# Altium PCB HPM5151-EVK-Lite.PcbDoc
Units mil, origin at the board's own origin, x right, y up, seen from the top; angles counter-clockwise.
Board outline 2559.1 x 1181.16 mil, 2 copper layers (Top Layer 1, Bottom Layer), stack 67.792 mil thick; 80 components, 79 nets, 357 pads, 167 vias.
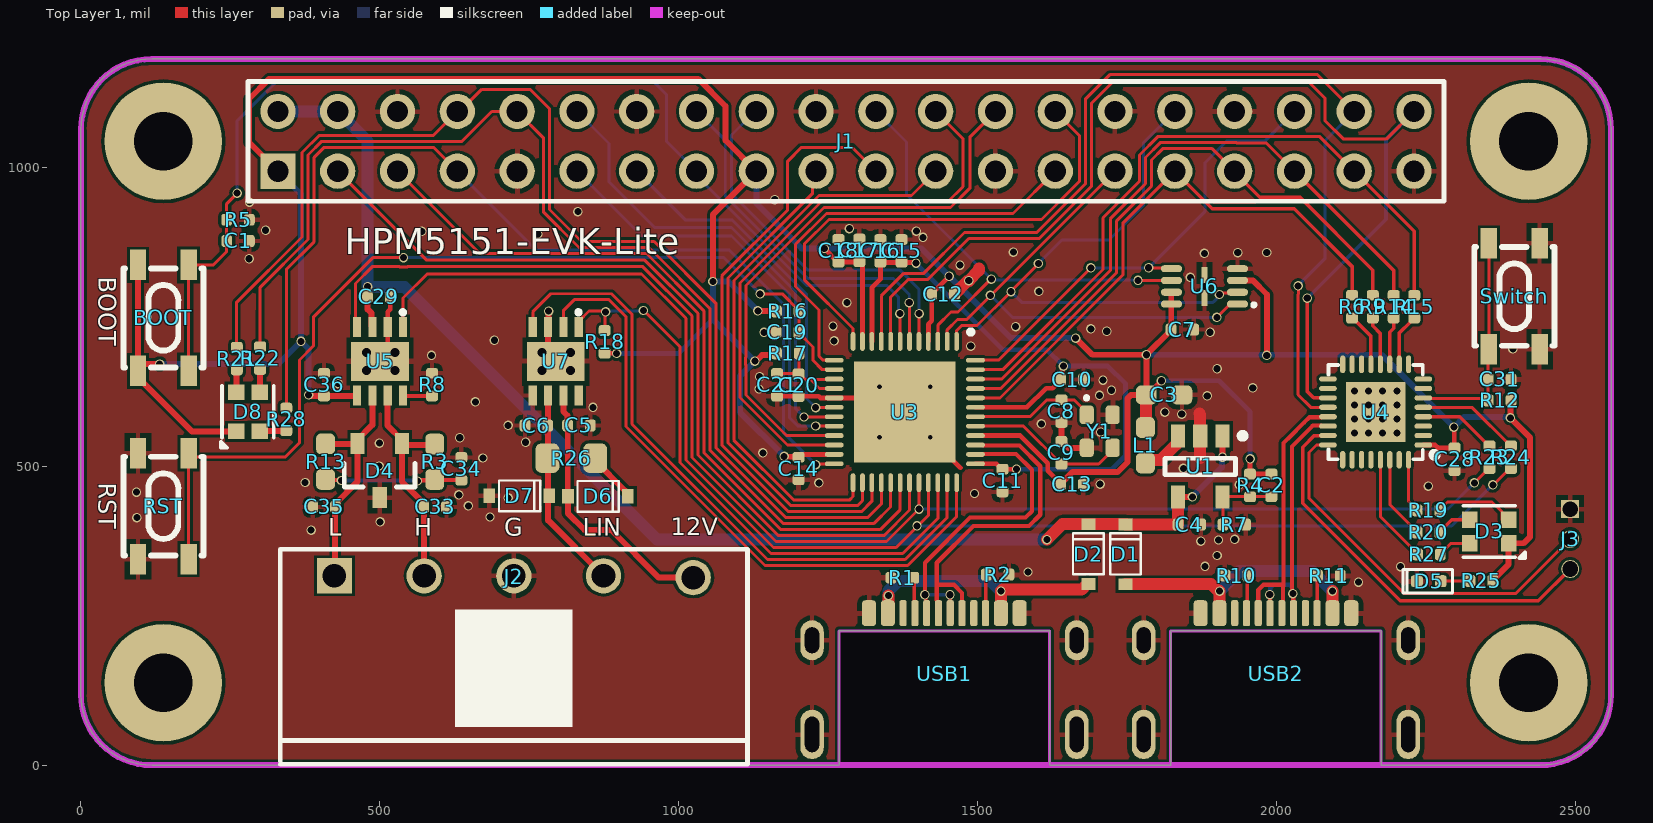
[diagram p0: Top Layer 1 view]
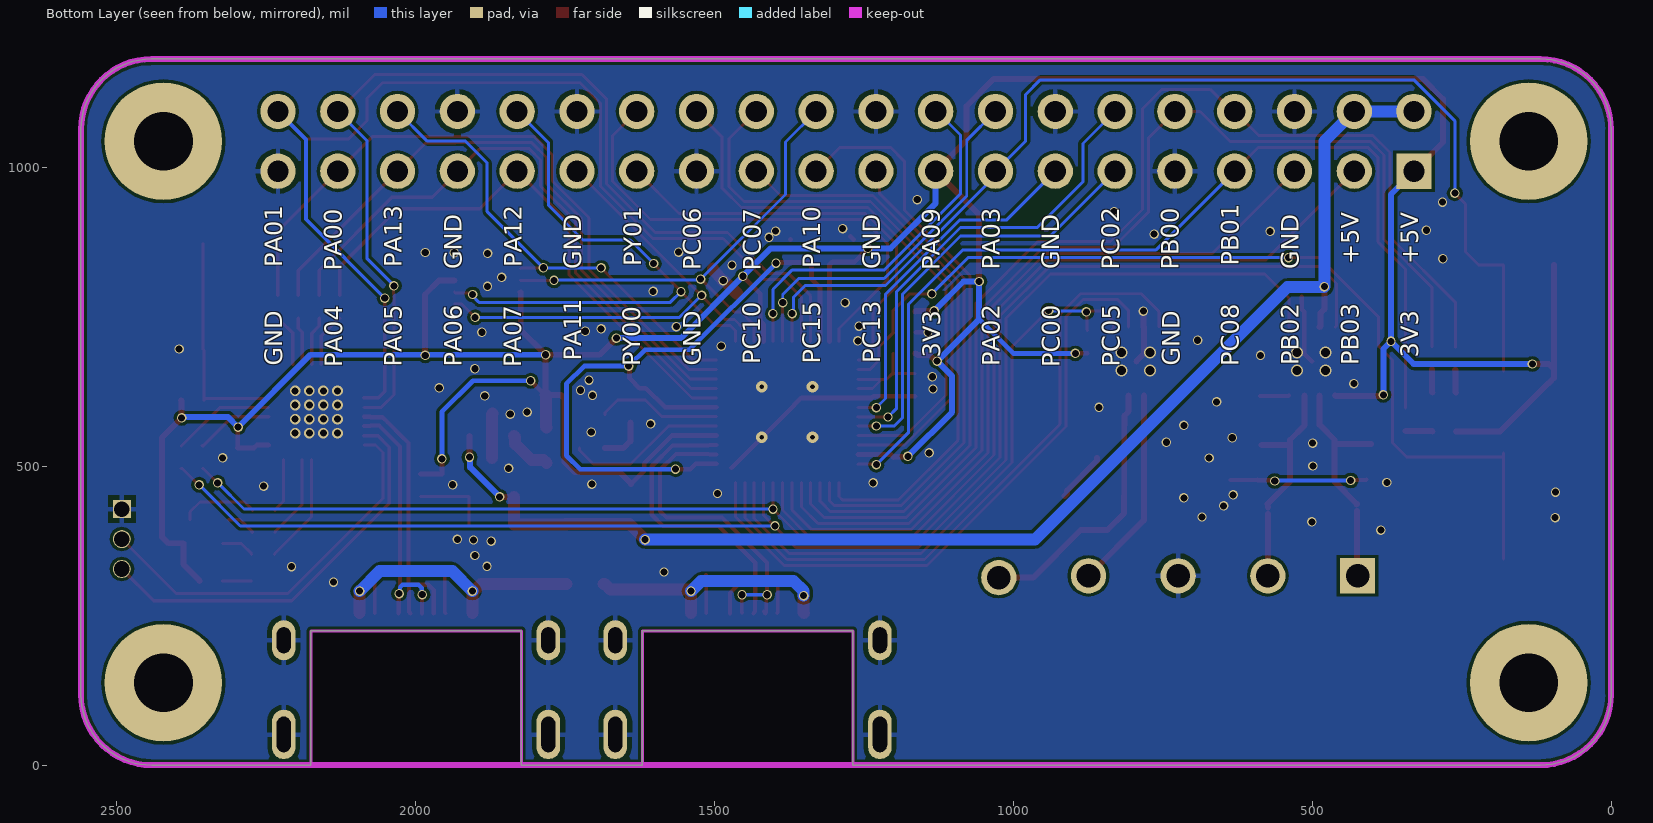
[diagram p1: Bottom Layer view, seen from below]

## Layer stack, top to bottom
Top Solder: solder mask 0.4, Solder Resist, Dk 3.5
Top Layer 1: signal copper 1.378
Dielectric 3: prepreg 2.8, PP-006, Dk 4.1
Dielectric1: dielectric 59.436, FR-4, Dk 4.8
Dielectric 4: prepreg 2.8, PP-006, Dk 4.1
Bottom Layer: signal copper 1.378
Bottom Solder: solder mask 0.4, Solder Resist, Dk 3.5

## Board outline
118.11,0.02 1268.06,0.02 1268.06,224.58 1620.03,224.58 1620.03,0.02 1822.59,0.02 1822.59,224.58 2174.55,224.58 2174.55,0.46 2175.05,-0.04 2440.91,-0.04 ccw(c2440.96,118.11) 2559.11,118.06 2559.06,118.12 2559.06,1063.02 2559.05,1063.55 ccw(c2440.94,1062.99) 2441.4,1181.1 2440.91,1181.12 118.11,1181.12 118.11,1181.09 ccw(c118.11,1062.99) 0.01,1062.99 0.01,118.12 ccw(c118.11,118.12)

## Design rules (kind name [scope] priority, off if disabled: settings)
Clearance [All] p1: gap=5 ignorepadtopadclearanceinfootprint=FALSE except(0: Arc-Hole Track-Hole SMDPad-Hole THPad-Hole Via-Hole Text-Hole)
DiffPairsRouting [All] p1: maxlimit=10 minlimit=1 mostfreqgap=7 toplayer_minwidth=1 toplayer_maxwidth=15 toplayer_prefwidth=7 bottomlayer_minwidth=1 bottomlayer_maxwidth=15 bottomlayer_prefwidth=7 maxuncoupledlength=500
FabricationTestPointUsage TestPointUsage [All] p1: valid=0 allowmultiple=FALSE
FabricationTestpoint Testpoint [All] p1: side=3 testpointundercomponent=TRUE minsize=40 maxsize=100 preferedsize=60 minholesize=0 maxholesize=40 preferedholesize=32 testpointgrid=1 allowsidetop=TRUE allowsidebottom=TRUE usegrid=TRUE gridtolerance=0.01
HoleSize [All] p1: absolutevalues=TRUE maxlimit=157.48 minlimit=1 maxpercent=80.000 minpercent=20.000
PlaneConnect [All] p1: planeconnectstyle=Direct reliefexpansion=20 reliefentries=4 reliefconductorwidth=10 reliefairgap=10
PolygonConnect [All] p1: thpad.connectstyle=Relief thpad.reliefconductorwidth=8 thpad.reliefentries=4 thpad.polygonreliefangle="90 Angle" thpad.airgapwidth=8 smdpad.connectstyle=Relief smdpad.reliefconductorwidth=8 smdpad.reliefentries=4 smdpad.polygonreliefangle="90 Angle" smdpad.airgapwidth=8 via.connectstyle=Direct via.reliefconductorwidth=10 via.reliefentries=4 via.polygonreliefangle="90 Angle" via.airgapwidth=10
RoutingVias [All] p1: holewidth=11.81 width=15.75 viastyle="Through Hole" minholewidth=7 minwidth=15.75 maxholewidth=157.48 maxwidth=236.22
SolderMaskExpansion [All] p1: expansion=4 istentingtop=FALSE
SupplyNets "Schematic Supply Nets_5" [InNet('VDD_12V')] p1: voltage=0.000
SupplyNets "Schematic Supply Nets_12" [InNet('VANA')] p2: voltage=0.000
SupplyNets "Schematic Supply Nets_6" [InNet('VDD_SOC')] p3: voltage=0.000
SupplyNets "Schematic Supply Nets_4" [InNet('VDD_3V3')] p4: voltage=0.000
SupplyNets "Schematic Supply Nets_3" [InNet('VDD_5V')] p5: voltage=0.000
SupplyNets "Schematic Supply Nets_2" [InNet('VUSB2')] p6: voltage=0.000
SupplyNets "Schematic Supply Nets_1" [InNet('VUSB1')] p7: voltage=0.000
SupplyNets "Schematic Supply Nets" [InNet('GND')] p8: voltage=0.000
Width [All] p1: maxlimit=30 minlimit=5 preferedwidth=10
25 further rules are at their usual default settings.

## Classes and differential pairs
component class CAN_LIN: C5 C6 C29 C33 C34 C35 C36 D4 D6 D7 J2 R3 R8 R13 R18 R26 U5 U7
component class DEBUG: C2 C3 C4 C28 C31 D1 D3 D5 J3 L1 R4 R6 R7 R9 R10 R11 R12 R14 R15 R19 R20 R23 R24 R25 R27 Switch U1 U4 USB2
component class MCU: BOOT C1 C7 C8 C9 C10 C11 C12 C13 C14 C15 C16 C17 C18 C19 C20 C21 D2 D8 J1 R1 R2 R5 R16 R17 R21 R22 R28 RST U3 U6 USB1 Y1
differential pair USBD: +USBD_P -USBD_N
differential pair DUSB: +DUSB_P -DUSB_N
differential pair CAN: +CAN_P -CAN_N

## Components (designator, comment, footprint, x,y, rotation, side; value= is the part's Value field where it differs from the comment)
BOOT "SW-PB4P" SW-PB4P 137.8,748.03 r270 top
C1 "100nF/50V" C0402 262.75,876.61 r0 top
C2 "22pF/50V" C0402 1990.97,467.97 r270 top
C3 "22uF/6.3V" C0603 1811.64,619.22 r0 top
C4 "4.7uF/10V" C0402 1853.91,402.44 r0 top
C5 "100nF/50V" C0402 832.97,568.15 r0 top
C6 "220pF/50V" C0402 761.69,567.92 r0 top
C7 "100nF/50V" C0402 1842.04,728.45 r0 top
C8 "10pF/50V" C0402 1639.95,592.06 r270 top
C9 "10pF/50V" C0402 1639.83,522.45 r90 top
C10 "100nF/50V" C0402 1657.76,644.91 r180 top
C11 "100nF/50V" C0402 1541.39,475.92 r270 top
C12 "100nF/50V" C0402 1442.08,787.88 r0 top
C13 "100nF/50V" C0402 1657.75,469.77 r0 top
C14 "100nF/50V" C0402 1200.3,496.11 r270 top
C15 "10uF/6.3V" C0402 1372.49,860.14 r90 top
C16 "100nF/50V" C0402 1337.16,860.14 r90 top
C17 "100nF/50V" C0402 1302.01,861.02 r90 top
C18 "10uF/6.3V" C0402 1267.03,860.31 r90 top
C19 "100nF/50V" C0402 1181.51,723.94 r180 top
C20 "100nF/50V" C0402 1200.3,635.42 r270 top
C21 "4.7uF/10V" C0402 1164.26,635.93 r270 top
C28 "100nF/50V" C0402 2297.24,511.58 r270 top
C29 "100nF/50V" C0402 498.18,782.93 r0 top
C31 "100nF/50V" C0402 2372.65,645.14 r180 top
C33 "47pF/50V" C0402 592.45,431.79 r180 top
C34 "10nF/50V" C0402 636.23,495.63 r270 top
C35 "47pF/50V" C0402 406.85,431.79 r180 top
C36 "100nF/50V" C0402 406.56,636.28 r90 top
D1 "B5817WS" SOD-323 1746.95,352.66 r90 top
D2 "B5817WS" SOD-323 1684.85,353.06 r90 top
D3 "LED" SMD_4P-L2.2-W2.1-BR 2355.18,390.79 r0 top
D4 "NUP2105L" SOT-23 499.7,492.63 r180 top
D5 "LED" "LED0402 GREEN" 2254.2,307.68 r0 top
D6 "PMEG4010BEA,115" SOD-323 864.45,449.69 r0 top
D7 "TVS" "SOD-323 TVS" 733.1,450.52 r0 top
D8 "LED" SMD_4P-L2.2-W2.1-BR 279.32,590.83 r270 top
J1 "Pin HDR2X20" "Pin HDR2X20/2.54mm-S" 1279.53,1043.31 r0 top locked
J2 "KF2EDGR-3.81-3P" KF2EDGR-3.81-5P 724.01,316.59 r0 top
J3 "HDR1X3" 1.27-3PIN 2490.69,378.07 r270 top
L1 "2.2uH" L0603 1780.34,534.98 r90 top
R1 "5.1K" R0402 1373.85,313.39 r0 top
R2 "5.1K" R0402 1533.26,318.62 r180 top
R3 "60.4R" R0603 591.69,507.36 r270 top
R4 "100K" R0402 1955.35,467.79 r270 top
R5 "10K" R0402 262.75,912.13 r180 top
R6 "22R" R0402 2125.93,766.7 r270 top
R7 "22.1K" R0402 1928.97,402.14 r0 top
R8 "10K" R0402 587.31,636.28 r270 top
R9 "22R" R0402 2160.55,766.7 r270 top
R10 "5.1K" R0402 1932.54,316.95 r0 top
R11 "5.1K" R0402 2087.06,316.95 r180 top
R12 "10K" R0402 2372.65,609.99 r180 top
R13 "60.4R" R0603 409.09,507.58 r90 top
R14 "22R" R0402 2195.58,766.7 r270 top
R15 "22R" R0402 2229.98,766.7 r270 top
R16 "10K" R0402 1182.15,758.99 r180 top
R17 "0R" R0402 1182.19,688.75 r180 top
R18 "10K" R0402 875.97,707.84 r90 top
R19 "2K" R0402 2253.51,426.22 r0 top
R20 "2K" R0402 2253.65,389.23 r0 top
R21 "2K" R0402 260.67,679.98 r270 top
R22 "2K" R0402 299.71,680.82 r270 top
R23 "22R" R0402 2355.74,514.95 r270 top
R24 "22R" R0402 2391.7,514.95 r270 top
R25 "2K" R0402 2342.16,308.09 r0 top
R26 "1K" R0805 820.17,513.39 r180 top
R27 "2K" R0402 2254.51,352.52 r0 top
R28 "2K" R0402 343.49,578.15 r270 top
RST "SW-PB4P" SW-PB4P 137.8,433.07 r270 top
Switch "SW-PB4P" SW-PB4P 2397.19,784.07 r270 top
U1 "TMI3408" SOT-23-5 1871.98,499.53 r270 top
U3 "HPM5151IN6" "QFN48 6*6" 1377.95,590.55 r270 top
U4 "CH32L103K8U6" QFN32_4*4 2165.35,590.55 r90 top
U5 "SIT1042TK/3" HVSON-8-EP(3X3) 500.31,675.32 r0 top
U6 "W25Q16JVUXIQ" USON-8-EP(2x3) 1879.11,800.73 r180 top
U7 "SIT1021QTK/1" HVSON-8-EP(3X3) 794.09,675.32 r0 top
USB1 "Type C" TYPE-C-16PIN-CB1.6 1444.04,152.77 r0 top
USB2 "Type C" TYPE-C-16PIN-CB1.6 1998.57,152.77 r0 top
Y1 "24MHz ±18ppm 20pF" "OSC 2016-4P" 1703.86,558.36 r270 top

## Footprints (in the part's own frame and the unit in brackets; to place one, negate y for a bottom-side part, rotate by r counter-clockwise, add the part's x,y. Pads: shape width x height; smd on the part's side, far side on the other; paste and mask are expansions set on the pad)
1.27-3PIN [mil]
  rect 30x30 hole 26: 1(-50,0)
  round 30 hole 26: 2(0,0) 3(50,0)
C0402 [mil]
  rrect50% 18x20 smd: 1(-19,0) 2(19,0)
  body extent -20,-10 20,10, height 22
C0603 [mm]
  rrect50% 0.88x0.8 smd: 1(-0.755,0) 2(0.755,0)
  body extent -0.8,-0.38 0.8,0.42, height 0.9
HVSON-8-EP(3X3) [mm]
  rect 0.35x0.85 smd: 1(0.975,1.45) 2(0.325,1.45) 3(-0.325,1.45) 4(-0.975,1.45) 5(-0.975,-1.45) 6(-0.325,-1.45) 7(0.325,-1.45) 8(0.975,-1.45)
  rect 2.45x1.65 smd: 9(0,0)
  silkscreen extent 0.92,2.03 1.02,2.13, body extent -1.5,-1.55 1.5,1.55, height 1
KF2EDGR-3.81-5P [mm]
  rect 1.5x1.5 hole 1: 1(-7.62,0)
  round 1.5 hole 1: 2(-3.81,0) 3(0,0) 4(3.81,0) 5(7.62,-0.076)
  silkscreen extent -9.92,-8 9.92,1.13, body extent -10.15,-17.07 10.29,1.33, height 7.88
L0603 [mm]
  rrect50% 0.88x0.8 smd: 1(-0.755,0) 2(0.755,0)
  body extent -0.8,-0.4 0.8,0.4, height 0.8
"LED0402 GREEN" [mil]
  rrect50% 20x20 smd: A(20,0) K(-20,0)
  silkscreen extent -43,-20 39,20, body extent -20,-10 20,9, height 18
"OSC 2016-4P" [mm] "Crystal, 4-Leads, Body 1.60x2.00mm, Pitch 1.40mm, IPC Medium Density"
  rrect50% 0.8x0.6 smd: 1(-0.7,-0.55) 2(0.7,-0.55) 3(0.7,0.55) 4(-0.7,0.55)
  silkscreen extent -1.45,-0.58 -1.4,-0.53, body extent -1.02,-0.82 1.03,0.83, height 0.4
"Pin HDR2X20/2.54mm-S" [mm] "Connector; Header; 20x2 Position"
  rect 1.5x1.5 hole 0.9: 1(-24.13,-1.27)
  round 1.5 hole 0.9: 2(-24.13,1.27) 3(-21.59,-1.27) 4(-21.59,1.27) 5(-19.05,-1.27) 6(-19.05,1.27) 7(-16.51,-1.27) 8(-16.51,1.27) 9(-13.97,-1.27) 10(-13.97,1.27) 11(-11.43,-1.27) 12(-11.43,1.27) 13(-8.89,-1.27) 14(-8.89,1.27) 15(-6.35,-1.27) 16(-6.35,1.27) 17(-3.81,-1.27) 18(-3.81,1.27) 19(-1.27,-1.27) 20(-1.27,1.27) 21(1.27,-1.27) 22(1.27,1.27) 23(3.81,-1.27) 24(3.81,1.27) 25(6.35,-1.27) 26(6.35,1.27) 27(8.89,-1.27) 28(8.89,1.27) 29(11.43,-1.27) 30(11.43,1.27) 31(13.97,-1.27) 32(13.97,1.27) 33(16.51,-1.27) 34(16.51,1.27) 35(19.05,-1.27) 36(19.05,1.27) 37(21.59,-1.27) 38(21.59,1.27) 39(24.13,-1.27) 40(24.13,1.27)
  silkscreen extent -25.4,-2.54 25.4,2.54, body extent -25.4,-2.54 25.4,2.54, height 7.58
QFN32_4*4 [mm]
  oval 0.22x0.75 smd mask+0.051: 1(-1.4,-2.025) 2(-1,-2.025) 3(-0.6,-2.025) 4(-0.2,-2.025) 5(0.2,-2.025) 6(0.6,-2.025) 7(1,-2.025) 8(1.4,-2.025) 17(1.4,2.025) 18(1,2.025) 19(0.6,2.025) 20(0.2,2.025) 21(-0.2,2.025) 22(-0.6,2.025) 23(-1,2.025) 24(-1.4,2.025)
  oval 0.75x0.22 smd mask+0.051: 9(2.025,-1.4) 10(2.025,-1) 11(2.025,-0.6) 12(2.025,-0.2) 13(2.025,0.2) 14(2.025,0.6) 15(2.025,1) 16(2.025,1.4) 25(-2.025,1.4) 26(-2.025,1) 27(-2.025,0.6) 28(-2.025,0.2) 29(-2.025,-0.2) 30(-2.025,-0.6) 31(-2.025,-1) 32(-2.025,-1.4)
  rect 2.54x2.54 smd mask+0.102: 33(0,0)
  silkscreen extent -2,-2.63 2,2, body extent -2,-2 2,2, height 0.73
"QFN48 6*6" [mm]
  oval 0.8x0.2 smd: 1(-3,2.2) 2(-3,1.8) 3(-3,1.4) 4(-3,1) 5(-3,0.6) 6(-3,0.2) 7(-3,-0.2) 8(-3,-0.6) 9(-3,-1) 10(-3,-1.4) 11(-3,-1.8) 12(-3,-2.2) 25(3,-2.2) 26(3,-1.8) 27(3,-1.4) 28(3,-1) 29(3,-0.6) 30(3,-0.2) 31(3,0.2) 32(3,0.6) 33(3,1) 34(3,1.4) 35(3,1.8) 36(3,2.2)
  oval 0.2x0.8 smd: 13(-2.2,-3) 14(-1.8,-3) 15(-1.4,-3) 16(-1,-3) 17(-0.6,-3) 18(-0.2,-3) 19(0.2,-3) 20(0.6,-3) 21(1,-3) 22(1.4,-3) 23(1.8,-3) 24(2.2,-3) 37(2.2,3) 38(1.8,3) 39(1.4,3) 40(1,3) 41(0.6,3) 42(0.2,3) 43(-0.2,3) 44(-0.6,3) 45(-1,3) 46(-1.4,3) 47(-1.8,3) 48(-2.2,3)
  rect 4.3x4.3 smd: 49(0,0)
  silkscreen extent -3.5,2.7 -3.3,2.9, body extent -3.05,-3.05 3.05,3.05, height 0.55
R0402 [mil]
  rrect50% 18x20 smd: 1(-19,0) 2(19,0)
  body extent -20,-10 20,10, height 16
R0603 [mm]
  rrect50% 0.88x0.8 smd: 1(-0.755,0) 2(0.755,0)
  body extent -0.8,-0.4 0.8,0.4, height 0.55
R0805 [mm]
  rrect50% 1.02x1.25 smd: 1(-1.015,0) 2(1.015,0)
  body extent -1,-0.63 1,0.63, height 0.6
SMD_4P-L2.2-W2.1-BR [mm]
  rect 0.66x0.7 smd paste+0 mask+0.05: 1(0.83,-0.5) 2(0.83,0.5) 3(-0.83,0.5) 4(-0.83,-0.5)
  silkscreen extent -1.1,-1.14 1.52,1.1, body extent -1.07,-1.03 1.07,1.02, height 1.92
SOD-323 [mm]
  rect 0.5x0.6 smd: A(-1.27,0) K(1.27,0)
  silkscreen extent -0.86,-0.65 0.89,0.65, body extent -1.36,-0.62 1.36,0.62, height 1.05
"SOD-323 TVS" [mm]
  rect 0.5x0.6 smd: 1(-1.27,0) 2(1.27,0)
  silkscreen extent -0.86,-0.65 0.89,0.65, body extent -1.36,-0.62 1.36,0.62, height 1.05
SOT-23 [mm]
  rect 0.6x0.9 smd: 1(-0.95,-1.15) 2(0.95,-1.15) 3(0,1.15)
  silkscreen extent -1.5,-0.3 1.5,0.7, body extent -1.47,-1.25 1.53,1.25, height 1.06
SOT-23-5 [mm]
  rect 0.99x0.6 smd: 1(-1.295,0.95) 2(-1.295,0) 3(-1.295,-0.95) 4(1.295,-0.95) 5(1.295,0.95)
  silkscreen extent -1.42,-1.5 0.35,1.93, body extent -1.4,-1.45 1.4,1.45, height 1.45
SW-PB4P [mm]
  rect 1.3x0.7 smd: 1(-2.25,1.075) 2(2.25,1.075) 3(2.25,-1.075) 4(-2.25,-1.075)
  silkscreen extent -2.1,-1.7 2.1,1.7, body extent -2.6,-1.63 2.6,1.63, height 2.5
TYPE-C-16PIN-CB1.6 [mm]
  oval 1x1.7 hole 0.6 slot 1.1 at 90 deg paste-2539.97 mask+0.05: 1(-5.62,1.425) 2(5.62,1.425)
  oval 1x2.1 hole 0.6 slot 1.5 at 90 deg copper offset 0,0 paste-2539.97 mask+0.05: 3(-5.62,-2.575) 4(5.62,-2.575)
  rrect50% 0.6x1.1 smd mask+0.05: A1(-3.2,2.575) A4(-2.4,2.575) A9(2.4,2.575) A12(3.2,2.575) B1(3.2,2.575) B4(2.4,2.575) B9(-2.4,2.575) B12(-3.2,2.575)
  rrect50% 0.3x1.1 smd mask+0.05: A5(-1.25,2.575) A6(-0.25,2.575) A7(0.25,2.575) A8(1.25,2.575) B5(1.75,2.575) B6(0.75,2.575) B7(-0.75,2.575) B8(-1.75,2.575)
  body extent -6.12,-5.02 6.12,1.73
USON-8-EP(2x3) [mm]
  oval 0.9x0.3 smd: 1(-1.4,0.75) 2(-1.4,0.25) 3(-1.4,-0.25) 4(-1.4,-0.75) 5(1.4,-0.75) 6(1.4,-0.25) 7(1.4,0.25) 8(1.4,0.75)
  rect 0.25x1.65 smd: 9(0,0)
  silkscreen extent -2.12,0.76 -2.07,0.81, body extent -1.55,-1 1.55,1, height 0.6

## Part data
BOOT: Manufacturer=DEALON(德艺隆), JCL-Code=C2905184, Name=Switch, PreferredModel=TD-1221SR-2.5H-250, WeldingType=SMD
C1 C5 C7 C10 C11 C12 C13 C14 C16 C17 C19 C20 C28 C29 C31: library part Cap, "Capacitor", JLC-Code=C307331, Manufacturer=SAMSUNG(三星), Name=Capacitance, PreferredModel=CL05B104KB54PNC, WeldingType=SMD
C2: library part Cap, "Capacitor", JLC-Code=C1555, Manufacturer=FH(风华), Name=Capacitance, PreferredModel=0402CG220J500NT, WeldingType=SMD
C3: library part Cap, "Capacitor", JLC-Code=C94018, Manufacturer=FH(风华), Name=Capacitance, PreferredModel=0603X226M6R3NT, WeldingType=SMD
C4: library part Cap, "Capacitor", JLC-Code=C368809, Manufacturer=SAMSUNG, Name=Capacitance, PreferredModel=CL05A475KP5NRNC, WeldingType=SMD
C6: library part Cap, "Capacitor", Manufacturer=Murata, InternalNumbering=GRD1205, JCL-Code=C388904, Name=Capacitance, PreferredModel=GCM155R71H221KA37D, WeldingType=SMD
C8 C9: library part Cap, "Capacitor", Manufacturer=muRata(村田), JCL-Code=C161520, Name=Capacitance, PreferredModel=GRM1555C1H100FA01D, WeldingType=SMD
C15 C18 C21: library part Cap, "Capacitor", Manufacturer=SAMSUNG, Name=Capacitance, WeldingType=SMD
  C15 C18: JCL-Code=C15525, PreferredModel=CL05A106MQ5NUNC
  C21: JCL-Code=C368809, PreferredModel=CL05A475KP5NRNC
C33 C35: library part Cap, "Capacitor", JLC-Code=C126511, Manufacturer=Murata, Name=Capacitance, PreferredModel=GCM1555C1H470JA16D, WeldingType=SMD
C34: library part Cap, "Capacitor", JLC-Code=C91601, Manufacturer=Murata, Name=Capacitance, PreferredModel=GCM155R71H103KA55D, WeldingType=SMD
C36: library part Cap, "Capacitor", JLC-Code=C85858, Manufacturer=Murata, InternalNumbering=GRD1123, Name=Capacitance, PreferredModel=GCM155R71H104KE02D, WeldingType=SMD
D1 D2: library part "Schottky Diode", "Schottky Diode", JLC-Code=C7420329, Manufacturer=R+O(宏嘉诚), Name="Schottky Diode", PreferredModel=B5817WS, WeldingType=SMD
D3 D8: library part LED_RGB, Name=LED, WeldingType=SMD
D4: "TVS", JLC-Code=C2890118, Manufacturer="TECH PUBLIC(台舟)", Name=TVS, PreferredModel=NUP2105LT1G, WeldingType=SMD
D6: library part "Schottky Diode", "Schottky Diode", JLC-Code=C36975, Manufacturer=Nexperia, Name="Schottky Diode", PreferredModel=PMEG4010BEA,115, WeldingType=SMD
J2: library part KF2EDGR-3.81-5P, Manufacturer=KEFA, Name=KF2EDGR-3.81-5P, PreferredModel=KF2EDGR-3.81-5P
L1: library part Inductors, "Inductors", JLC-Code=C48944989, Manufacturer=ZE(增益), Name=Inductors, PreferredModel=ZEMS160808-2R2M, WeldingType=SMD
R1 R2 R8 R10 R11 R12 R18 R19 R20 R21 R22 R25 R26 R27 R28: library part Res, "Resistance", Name=Resistance, WeldingType=SMD
R3 R13 R16: library part Res, "Resistance", JLC-Code=C144807, Manufacturer=YAGEO, Name=Resistance, WeldingType=SMD
  R3: InternalNumbering=GRD1496, PreferredModel=AC0603FR-0760R4L
  R13: PreferredModel=AC0603FR-0760R4L
  R16: PreferredModel=AC0402FR-0710KL
R4: library part Res, "Resistance", JLC-Code=C25741, Manufacturer=UNI-ROYAL(厚声), Name=Resistance, PreferredModel=0402WGF1003TCE, WeldingType=SMD
R5: library part Res, "Resistance", Manufacturer=YAGEO, InternalNumbering=GRD1049, JCL-Code=C144807, Name=Resistance, PreferredModel=AC0402FR-0710KL, WeldingType=SMD
R6 R9 R14 R15 R23 R24: library part Res, "Resistance", JLC-Code=C25092, Manufacturer=UNI-ROYAL(厚声), Name=Resistance, PreferredModel=0402WGF220JTCE, WeldingType=SMD
R7: library part Res, "Resistance", JLC-Code=C43473, Manufacturer=UNI-ROYAL(厚声), Name=Resistance, PreferredModel=0402WGF2212TCE, WeldingType=SMD
R17: library part Res, "Resistance", Manufacturer=UNI-ROYAL(厚声), Name=Resistance, PreferredModel=0402WGF0000TCE, WeldingType=SMD
RST Switch: JLC-Code=C2905184, Manufacturer=DEALON(德艺隆), Name=Switch, PreferredModel=TD-1221SR-2.5H-250, WeldingType=SMD
U1: library part SM8082AAAC, "Integrated Circuit", Manufacturer=silergy, Name=LDO, PreferredModel=SM8082AAAC, WeldingType=SMD
U3: library part HPM5151IN61_1, "32 bit RISC-V MCU", Manufacturer="HPMICRO Semiconductor", Name="32 bit RISC-V MCU", PreferredModel=HPM5151IN61, WeldingType=SMD
U4: "RISC-V MCU", Manufacturer=WCH, Name=MCU, PreferredModel=CH32L103K8U6, WeldingType=SMD
U5: "5M CAN FD/-40~125℃/AEC-Q100", JLC-Code=C38695, Manufacturer=SIT, Name="CAN Transceiver", PreferredModel=SIT1042TK/3, WeldingType=SMD
U6: "Serial flash memory with DUAL/QUAD SPI", Manufacturer=Winbond, Name="Serial flash memory", PreferredModel=W25Q16JVUXIQ, WeldingType=SMD
U7: "12V LIN/-40~150℃/AEC-Q100", Manufacturer=SIT(芯力特), Name="LIN Transceiver", PreferredModel=SIT1021QTK/1, WeldingType=SMD
USB1 USB2: "USB Type C", Name="USB Type C", WeldingType=SMD
Y1: library part XTAL_4P, Manufacturer=YXC(扬兴晶振), JCL-Code=C22434877, Name="Crystal oscillator", PreferredModel=XL7EL89COI-111YLC-24M, WeldingType=SMD
D5: Name=LED, WeldingType=SMD
D7: Name=TVS, WeldingType=SMD

## Free pads (board coordinates)
  round 196.85 hole 98.43: ""(137.81,137.8) ""(137.81,1043.32) ""(2421.27,137.8) ""(2421.27,1043.32)

## Via types
v1: diameter 15.75, hole 11.81, Top Layer 1 to Bottom Layer, tented both sides, 139 vias
v2: diameter 17.72, hole 11.81, Top Layer 1 to Bottom Layer, tented both sides, 16 vias
v3: diameter 20, hole 15, Top Layer 1 to Bottom Layer, tented both sides, 8 vias
v4: diameter 19.68, hole 7.87, Top Layer 1 to Bottom Layer, tented both sides, 4 vias

## Nets (pads, with @x,y where several pads share a name; then routed paths per layer and width w, separated by ;. In a path a pad name is that pad's centre, name@x,y a point inside that pad or via, vN(x,y) a via of type N, cw(c..) or ccw(c..) an arc to the next point about the centre after c; other vN are vias at no path point)
BOOT0: BOOT.1 BOOT.2 C1.1 J1.15 R5.2 U3.7 | length 1887
  Top Layer 1 w5: BOOT.2 BOOT.1 221.41,836.61 243.75,858.95 C1.1 R5.2 243.75,938.69 v1@262.21,957.15 ; v1(1369.7,755.05) 1369.53,754.88 1369.53,709.21 U3.7
  Bottom Layer w5: v1(261.38,956.55) 261.38,1077.52 330.04,1146.19 954.57,1146.19 979.04,1121.72 979.04,1043.8 J1.15 1029.53,985.84 1213.4,801.96 1347.85,801.96 1367.76,782.06 1367.76,757 v1(1369.7,755.05)
CAN0_RX: R23.2 U3.32 U5.4 | length 2406.4
  Top Layer 1 w5: U5.4 459.34,734.99 459.34,805.7 487.17,833.53 532.88,833.53 533.09,833.32 545.83,833.32 546.04,833.53 939.79,833.53 1021.87,751.45 1021.87,514.56 1162.6,373.83 1347.13,373.83 v1(1401.57,428.27) U3.32 ; v1(2330.44,472.18) 2330.7,472.18 2354.48,495.95 R23.2
  Bottom Layer w5: v1(1401.57,428.27) 2286.53,428.27 v1(2330.44,472.18)
CAN0_TX: R24.2 U3.33 U5.1 | length 2382.5
  Top Layer 1 w5: U5.1 538.69,781.07 579.13,821.51 937.67,821.51 1011.87,747.31 1011.87,510.42 1158.46,363.83 1363.45,363.83 1399.02,399.4 1417.32,417.7 U3.33 ; v1(2361.28,468.87) 2362.53,468.87 2389.62,495.95 R24.2
  Bottom Layer w5: v1(1398.34,400.08) 2292.49,400.08 v1(2361.28,468.87)
CAN_N: C35.1 D4.2 J2.1 R13.2 U5.6 | length 378.8
  Top Layer 1 w10: R13.2@401.75,536.7 461.09,536.7 D4.2 ; J2.1 425.18,317.76 C35.1@425.18,424.9 ; C35.1@425.85,435.65 424.91,436.59 462.3,473.98 D4.2 ; U5.6 487.51,569.03 462.3,543.82 D4.2
CAN_P: C33.2 D4.1 J2.2 R3.1 U5.7 | length 361
  Top Layer 1 w10: U5.7 513.1,567.82 537.11,543.82 D4.1 ; 573.4,420.42 573.4,317.21 J2.2 ; C33.2 C33.2@574.07,431.17 ; C33.2@574.75,436.59 537.11,474.24 D4.1 ; R3.1@585.06,535.77 539.25,535.77 D4.1
DCAN_RX: R23.1 U4.4 | length 130.8
  Top Layer 1 w6: U4.4 2306.01,582.68 2354.74,533.95 R23.1
DCAN_TX: R24.1 U4.5 | length 173.3
  Top Layer 1 w5: U4.5 2326.23,598.43 2390.7,533.95 R24.1
DEBUG_SWCLK: J3.2 U4.24 | length 654
  Top Layer 1 w5: U4.24 2066.44,535.43 2054.02,523.01 2054.02,446.36 2213.63,286.75 2399.37,286.75 J3.2
DEBUG_SWDIO: J3.3 U4.23 | length 680.8
  Top Layer 1 w6: U4.23 2062.89,551.18 2043.52,531.81 2043.52,437.93 2206.65,274.8 2437.42,274.8 J3.3
DUSB_N: U4.21 USB2.A7 USB2.B7 | length 462.9
  Top Layer 1 w7: USB2.B7@1969.04,254.16 1969.04,293.12 1977.54,301.62 2011.25,301.62 ; USB2.A7@2008.41,254.16 2010.59,256.33 2010.59,298.7 2011.25,299.37 2011.25,301.62 ; U4.21 2074.75,582.68 2073.87,581.8 2054.48,581.8 2046.28,573.6 2019.46,546.78 2015.35,542.68 2011.25,538.58 2011.25,301.62
DUSB_P: U4.22 USB2.A6 USB2.B6 | length 449.4
  Top Layer 1 w7: v1(1988.21,285.25) 1988.47,284.98 1988.47,254.41 USB2.A6 ; 2025.25,294.78 2025.25,532.78 2060.28,567.8 2073.87,567.8 2074.75,566.93 U4.22 ; 2025.29,294.75 2025.29,288.56 2027.53,286.32 2027.53,254.71 USB2.B6
  Bottom Layer w7: v1(1988.21,285.25) 1989.11,286.15 1989.11,296.33 1994.4,301.62 2021.51,301.62 2025.61,297.52 2025.61,288.24 v1(2026.96,286.89)
GND: C1.2 C3.2 C4.2 C5.2 C6.1 C7.2 C8.2 C9.2 C10.1 C11.2 C12.2 C13.2 C14.2 C15.2 C16.2 C17.2 C18.2 C19.2 C20.2 C21.2 C28.2 C29.2 C31.1 C33.1 C34.1 C35.2 C36.2 D4.3 D5.K D7.1 J1.6 J1.9 J1.14 J1.20 J1.25 J1.30 J1.34 J1.39 J2.3 J3.1 R1.1 R2.1 R5.1 R7.2 R8.1 R10.1 R11.1 RST.3 RST.4 Switch.1 Switch.2 U1.2 U3.17 U3.49 U4.33 U5.2 U5.9 U6.4 U6.9 U7.3 U7.5 U7.9 USB1.1 USB1.2 USB1.3 USB1.4 USB1.A1 USB1.A12 USB1.B1 USB1.B12 USB2.1 USB2.2 USB2.3 USB2.4 USB2.A1 USB2.A12 USB2.B1 USB2.B12 Y1.2 Y1.4 | length 802.5
  Top Layer 1 w8: U5.9 513.1,688.11 U5.2 513.1,757.96 517.25,762.11 C29.2 C29.2 ; v1(1142.4,723.89) C19.2 ; C21.2 1233.73,616.93 1236.48,614.17 U3.17 1354.33,614.17 U3.49 1471.01,497.49 ; C18.2@1267.12,879.23 C18.2 1267.37,879.31 1272.33,884.28 C18.2@1272.33,884.61 ; C15.2@1372.4,879.23 C15.2
  Top Layer 1 w10: v1(782.15,759.22) 781.72,758.79 781.72,732.84 U7.3 781.29,688.11 U7.9 ; C8.2 1639.89,573 1639.89,541.5 1640.78,541.5 1651.48,530.8 Y1.2
  Top Layer 1 w20: C12.2 1482.55,809.35 v1@1485.17,809.35 ; v1(1484.86,810.35) 1501.89,827.38 1501.89,830.95 ; 1870.76,587.87 1871.98,586.66 1871.98,513.31
  other v1: 2136.7,306.11 1583.91,322.96 1880,332.49 2206.87,332.02 1900.11,350.59 1873.08,374.72 1902.57,376.5 1929.37,377.62 385.15,392.92 500.36,406.9 93.48,414.02 684.15,415.02 648.07,433.63 714.64,447.1 632.25,452.13 1494.45,454.28 93,456.69 2253.55,466.68 1937.42,468.93 1704.7,469.95 375.04,472.76 1234.32,472.09 1843.81,496.47 498.76,500.22 672.16,513.7 2322.1,513.91 1140.63,522.38 499.3,538.62 743.86,540.01 633.55,547.55 1705.56,556.89 714.41,568.15 1606.42,570.63 1841.07,587.12 1812.98,590.3 856.48,598.33 659.81,607.59 1883.69,617.56 1703.56,618.41 1723.52,626.95 1134.09,629.04 1959.8,630.92 430.15,637.95 1709.4,643.94 1135.21,649.51 1900.11,662.92 586.35,685.22 2394.92,696.02 1488.14,700.87 1259.79,709.46 691.4,710.56 1888.42,723.99 1715.62,725.67 1689.11,729.74 1563.13,733.43 1257.76,734.09 1281.04,773.45 1601.99,792.29 1879.11,800.73 1855.45,815.76 1470.17,836.1 281.37,846.95 1878.92,855.96 1934.77,857.24 1983.19,857.39 1559.54,857.93 1408.32,882.71 764.17,888.08 570.16,892.62 1397.1,893.21 308.87,894.6 1285.07,897.36 831.1,925.77 281.91,941.71 1160.39,945.92
  other v2: 2129.92,555.12 2153.54,555.12 2177.17,555.12 2200.79,555.12 2129.92,578.74 2153.54,578.74 2177.17,578.74 2200.79,578.74 2129.92,602.36 2153.54,602.36 2177.17,602.36 2200.79,602.36 2129.92,625.98 2153.54,625.98 2177.17,625.98 2200.79,625.98
  other v3: 477.69,660.36 524.93,660.36 771.47,660.36 818.71,660.36 477.69,690.28 524.93,690.28 771.47,690.28 818.71,690.28
  other v4: 1335.63,548.23 1420.28,548.23 1335.63,632.87 1420.28,632.87
I2C0_SCL: J1.28 U3.12 | length 833.3
  Top Layer 1 w5: U3.12 1291.34,730.21 1210.55,811 1210.55,872.23 1251.05,912.73 1606.52,912.73 1669.86,976.06 1669.86,1052.98 J1.28
I2C0_SDA: J1.27 U3.13 | length 716.6
  Top Layer 1 w5: U3.13 1241.17,677.17 1234.28,684.05 1234.28,761.33 1195.13,800.48 1195.13,870.96 1246.91,922.73 1558.95,922.73 J1.27
I2C1_SCL: J1.5 U3.30 | length 1286.7
  Top Layer 1 w5: J1.5 667.14,855.7 945.91,855.7 1041.87,759.73 1041.87,522.84 1170.89,393.83 1194.01,393.83 1336.76,393.83 1370.08,427.15 U3.30
I2C1_SDA: J1.3 U3.31 | length 1411
  Top Layer 1 w5: J1.3 578.23,844.6 942.86,844.6 1031.87,755.59 1031.87,518.7 1166.75,383.83 1189.86,383.83 1342.99,383.83 1385.83,426.66 U3.31
JTAG_TCK: J1.33 R9.1 U3.45 | length 1034.3
  Top Layer 1 w5: U3.45 1538.56,629.92 1732.35,823.71 1732.35,910.27 1790.45,968.37 1790.45,1012.25 1809.16,1030.96 1891.87,1030.96 J1.33
  Top Layer 1 w6: J1.33 1929.53,991.56 1971.59,949.5 2038.86,949.5 2160.55,827.8 R9.1
JTAG_TDI: J1.35 R14.1 U3.46 | length 1069.7
  Top Layer 1 w5: U3.46 1540.17,645.67 1721.57,827.07 1721.57,913.63 1780.45,972.51 1780.45,1016.39 1805.02,1040.96 1932.62,1040.96 1932.87,1040.71 1982.12,1040.71 J1.35
  Top Layer 1 w6: J1.35 2195.58,827.25 R14.1
JTAG_TDO: J1.37 R15.1 U3.47 | length 1144.3
  Top Layer 1 w5: U3.47 1541.77,661.42 1709.21,828.85 1709.21,915.42 1770.45,976.65 1770.45,1020.53 1800.87,1050.96 2071.87,1050.96 J1.37
  Top Layer 1 w6: J1.37 2229.98,892.86 R15.1
JTAG_TMS: J1.31 R6.1 U3.44 | length 951.8
  Top Layer 1 w5: U3.44 1536.96,614.17 1742.61,819.83 1742.61,906.39 J1.31
  Top Layer 1 w6: J1.31 1892.05,930.78 2029.04,930.78 2125.93,833.89 R6.1
LIN: C6.2 D7.2 J2.4 R26.2 U7.6 | length 340
  Top Layer 1 w10: U7.6 781.29,409.31 J2.4
NetC2_2: C2.2 R4.2 R7.1 U1.5 | length 128.1
  Top Layer 1 w5: R7.1 1909.97,448.8 1909.8,448.97 C2.2
NetC8_1: C8.1 U3.42 Y1.1 | length 210.6
  Top Layer 1 w5: U3.42 1587.31,582.68 1615.68,611.06 C8.1 1661,611.06 1682.21,589.85 Y1.1
NetC9_1: C9.1 U3.41 Y1.3 | length 269.4
  Top Layer 1 w5: U3.41 1576.35,566.93 C9.1 1702.1,503.45 1725.52,526.86 Y1.3
NetC19_1: C19.1 R16.1 RST.1 RST.2 U3.14 | length 1616.4
  Top Layer 1 w5: RST.2 RST.1@180.12,515.75 ; RST.1 RST.1@180.12,515.75 ; v1(539.46,848.69) 488.19,848.69 389.39,749.9 389.39,701.67 365.49,677.77 365.49,539.15 342.08,515.75 RST.1@180.12,515.75 ; v1(1135.99,788.16) 1172.98,788.16 1201.15,759.99 R16.1 1200.83,758.67 1200.83,724.26 C19.1 ; C19.1@1200.51,722.94 1224.28,699.17 1224.28,676.94 1239.8,661.42 U3.14
  Bottom Layer w5: v1(539.46,848.69) 1075.46,848.69 v1(1135.99,788.16)
NetC34_2: C34.2 R3.2 R13.1 | length 228.3
  Top Layer 1 w7: R13.1 409.96,476.98 434.67,476.98 v1(435.55,476.1) ; v1(562.53,475.25) 563.73,476.44 590.49,476.44 R3.2 592.2,477.13 635.72,477.13 C34.2
  Bottom Layer w7: v1(435.55,476.1) 435.87,475.78 560.91,475.78 v1@561.23,475.46
NetD3_2: D3.2 R19.2 | length 130.9
  Top Layer 1 w5: R19.2 2272.51,427.22 2285.51,440.22 2360.12,440.22 2376.76,423.58 D3.2@2376.76,410.21
NetD3_3: D3.3 R20.2 | length 48
  Top Layer 1 w6: R20.2 2272.65,390.23 2292.64,410.21 D3.3@2311.4,410.21
NetD3_4: D3.4 R27.2 | length 57.2
  Top Layer 1 w5: R27.2 2273.51,353.52 2290.83,370.84 D3.4@2322.5,370.84
NetD5_A: D5.A R25.1 | length 49.1
  Top Layer 1 w5: D5.A 2274.4,307.88 2322.95,307.88 R25.1
NetD6_K: D6.K R26.1 | length 86.2
  Top Layer 1 w10: R26.1 860.13,508.87 909.61,459.38 909.61,454.53 D6.K
NetD8_2: D8.2 R28.2 | length 44.9
  Top Layer 1 w10: D8.2 299.5,558.65 342.99,558.65 R28.2
NetD8_3: D8.3 R22.2 | length 38.6
  Top Layer 1 w10: D8.3 299.36,623.85 299.36,661.46 R22.2
NetD8_4: D8.4 R21.2 | length 37.9
  Top Layer 1 w10: D8.4 260.15,624.02 260.15,660.46 R21.2
NetL1_1: L1.1 U1.3 | length 79.6
  Top Layer 1 w20: L1.1 1785.64,510.55 1805.94,510.55 1832.76,537.38 1832.76,548.7 U1.3
NetR1_2: R1.2 USB1.A5 | length 60.1
  Top Layer 1 w6: R1.2 1393.84,312.4 1393.84,255.14 USB1.A5
NetR2_2: R2.2 USB1.B5 | length 65
  Top Layer 1 w6: USB1.B5 1513.6,254.8 1513.6,317.97 R2.2
NetR8_2: R8.2 U5.8 | length 49
  Top Layer 1 w7: U5.8 539.65,617.28 R8.2
NetR10_2: R10.2 USB2.A5 | length 63.7
  Top Layer 1 w6: USB2.A5 1950.45,255.23 1950.45,315.86 R10.2
NetR11_2: R11.2 USB2.B5 | length 63.1
  Top Layer 1 w6: USB2.B5 2067.76,254.44 2067.76,316.65 R11.2
NetR19_1: R19.1 U4.32 | length 90.4
  Top Layer 1 w5: U4.32 2220.47,441.25 2234.51,427.22 R19.1
NetR20_1: R20.1 U4.30 | length 140.5
  Top Layer 1 w5: U4.30 2188.98,435.9 2234.65,390.23 R20.1
NetR27_1: R27.1 U4.29 | length 184.1
  Top Layer 1 w5: U4.29 2173.23,415.8 2235.51,353.52 R27.1
PA00: J1.38 U3.9 U4.20 | length 1700.6
  Top Layer 1 w5: U3.9 1338.58,784.82 1376.34,822.57 1409.6,822.57 1477.83,890.8 1598.74,890.8 1679.86,971.92 1679.86,1113.76 1720.76,1154.66 2068.18,1154.66 J1.38 ; v1(2035.71,801.61) 2036.07,801.25 2036.07,787.86 2035.55,787.33 2035.55,619.64 2056.77,598.43 U4.20
  Bottom Layer w5: v1(2035.71,801.61) 2035.71,802.43 2080.96,847.68 2080.96,1044.74 J1.38
PA01: J1.40 U3.8 U4.19 | length 1841.1
  Top Layer 1 w5: U3.8 1354.33,782.89 1384.02,812.57 1416.76,812.57 1484.99,880.8 1602.88,880.8 1689.86,967.78 1689.86,1106.71 1724.4,1141.25 2054.76,1141.25 2080.43,1115.58 2080.43,1078.25 2111.92,1046.77 2182.99,1046.77 J1.40
  Top Layer 1 w6: v1(2050.92,780.97) 2050.92,624.75 2061.5,614.17 U4.19
  Bottom Layer w6: v1(2050.92,780.97) 2182.7,912.74 2182.7,1046.48 J1.40
PA03: J1.16 U3.6 | length 616
  Top Layer 1 w5: v1(1385.33,773.56) 1385.58,773.31 1385.58,708.91 U3.6
  Bottom Layer w5: J1.16 1077.62,1045.22 1077.62,951.89 1215.63,813.88 1358.59,813.88 1385.33,787.15 v1(1385.33,773.56)
PA4: R15.2 U4.10 | length 88
  Top Layer 1 w6: U4.10 2205.06,670.61 2205.06,722.78 2222.98,740.7 2222.98,740.89 2229.79,747.7 R15.2
PA5: R14.2 U4.11 | length 80.2
  Top Layer 1 w6: U4.11 2188.98,723.97 2195.58,730.58 R14.2
PA6: R9.2 U4.12 | length 82.7
  Top Layer 1 w6: R9.2 2160.55,734.7 2173.23,722.02 U4.12
PA7: R6.2 U4.13 | length 91.1
  Top Layer 1 w6: R6.2 2126.93,747.7 2157.48,717.15 U4.13
PA09: J1.18 U3.5 | length 623.1
  Top Layer 1 w5: U3.5 1401.67,708.76 1401.67,754.97 v1(1401.77,755.06)
  Bottom Layer w5: J1.18 1127.66,1093.31 1088.14,1053.79 1088.14,955.51 1215.34,828.31 1369.31,828.31 1401.77,795.86 v1(1401.77,755.06)
PA10: J1.22 U3.3 U6.6 | length 811.3
  Top Layer 1 w5: U3.3 1433.07,735.64 1455.32,757.89 1466.98,757.89 1521.76,812.68 v1(1522.63,812.68) ; v1(1767.86,810.72) 1767.91,810.77 1823.79,810.77 U6.6
  Bottom Layer w5: J1.22 1380.8,1042.04 1380.8,954.51 1523.61,811.7 1766.88,811.7 v1(1767.86,810.72)
PA11: J1.29 U3.2 U6.1 | length 847.5
  Top Layer 1 w5: U3.2 1448.82,728.15 1465.96,745.29 1481.51,745.29 J1.29 ; v1(1899.89,748.97) 1900.03,748.97 1922.27,771.21 U6.1
  Bottom Layer w5: v1(1521.14,785.71) 1557.88,748.97 v1(1899.89,748.97)
PA12: J1.32 U3.1 U6.2 | length 991.9
  Top Layer 1 w5: U3.1 1464.57,726.92 1472.94,735.29 1498.83,735.29 v1(1555.46,791.91) 1555.46,792.53 1601.21,838.28 v1(1601.21,838.9) ; v1(1904.07,787.16) 1906.98,787.16 1909.41,789.59 1932.92,789.59 U6.2
  Bottom Layer w5: v1(1555.46,791.91) 1573.39,773.98 1893.36,773.98 1894.39,775.01 1894.6,775.01 1904.07,784.48 v1(1904.07,787.16) ; v1(1601.21,838.9) 1640.54,878.23 1719.28,878.23 1777.24,936.19 1777.24,1041.02 J1.32
PA13: J1.36 U3.48 U6.5 | length 792.4
  Top Layer 1 w5: U3.48 1534.63,677.17 v1(1689.01,831.55) ; v1(1785.71,831.8) 1786.48,831.03 1823.22,831.03 U6.5
  Bottom Layer w5: v1(1689.01,831.55) 1689.27,831.8 v1(1785.71,831.8) 1879.57,925.67 1879.57,1006.99 1916.11,1043.52 1979.74,1043.52 J1.36
PB00: J1.10 R22.1 U3.29 | length 1907.7
  Top Layer 1 w5: R22.1@299.59,699.62 299.59,760.62 299.76,760.79 299.76,799.2 379.82,879.26 379.82,1020.4 402.64,1043.21 637.15,1043.21 687.24,1093.31 J1.10 773.4,1049.43 773.4,925.43 833.13,865.7 950.05,865.7 1051.87,763.88 1051.87,526.98 1175.03,403.83 1325.88,403.83 1353.83,431.78 1353.83,471.94 U3.29
PB01: J1.8 R21.1 U3.28 | length 1966.1
  Top Layer 1 w5: R21.1@259.81,698.9 259.81,773.39 369.82,883.4 369.82,1024.54 398.5,1053.21 589.43,1053.21 J1.8 633.48,1093.31 670.5,1130.33 751.17,1130.33 783.64,1097.86 783.64,929.33 837.28,875.7 958.72,875.7 1061.87,772.55 1061.87,531.13 1179.17,413.83 1315.57,413.83 1338.88,437.14 1338.88,472.14 U3.28
PB08: U3.36 U7.2 | length 1075.3
  Top Layer 1 w5: U7.2 806.88,759.96 825.29,778.36 883.29,778.36 911.57,750.08 911.57,566.19 1143.93,333.83 1382.66,333.83 1464.57,415.73 U3.36
PC00: J1.13 U3.18 | length 596.4
  Top Layer 1 w5: v1(1228.83,597.96) 1229.06,598.2 1259.61,598.2 U3.18
  Bottom Layer w5: J1.13 1011.34,911.49 1089.73,911.49 1213.51,787.71 1213.51,613.28 v1(1228.83,597.96)
PC02: J1.12 U3.19 | length 794.3
  Top Layer 1 w5: v1(1209.36,582.2) 1209.74,582.59 1259.76,582.59 U3.19
  Bottom Layer w5: J1.12 883.08,1039.76 883.08,975.63 959.61,899.09 1087.99,899.09 1194.8,792.28 1194.8,596.76 v1(1209.36,582.2)
PC05: J1.11 U3.20 | length 728.6
  Top Layer 1 w5: v1@1228.55,567.22 1228.69,567.07 1259.7,567.07 U3.20
  Bottom Layer w5: J1.11 938.06,884.77 1088.17,884.77 1184.8,788.14 1184.8,581.43 1199.4,566.83 1228.44,566.83 v1(1228.83,567.22)
PC06: J1.26 U3.21 | length 947.1
  Top Layer 1 w5: U3.21 1180.16,551.18 1112.17,619.17 1112.17,668.87 1111.87,669.16 1111.87,682.11 1112.17,682.41 1112.17,785.91 1112.17,802.13 1242.76,932.73 1454.43,932.73 1487.28,965.58 1487.28,1051.05 J1.26
PC07: J1.24 U3.22 | length 966.5
  Top Layer 1 w5: U3.22 1181.76,535.43 1102.17,615.03 1102.17,664.73 1101.87,665.02 1101.87,686.26 1102.17,686.55 1102.17,790.05 1102.17,806.28 1238.62,942.73 1450.28,942.73 1475.08,967.52 1475.08,1047.76 J1.24
PC09: J1.7 R28.1 U3.24 | length 1661.4
  Top Layer 1 w5: R28.1 343.49,828.78 390.17,875.46 390.17,1016.6 406.78,1033.21 589.62,1033.21 J1.7 ; v1(1228.84,502.5) 1229.73,503.39 1259.29,503.39 U3.24
  Bottom Layer w5: J1.7 761.61,861.22 1084.67,861.22 1174.8,771.09 1174.8,556.54 v1(1228.84,502.5)
PC10: J1.23 U3.25 | length 946.4
  Top Layer 1 w5: U3.25 1291.34,449.19 1285.97,443.83 1191.6,443.83 1091.87,543.55 1091.87,793.9 1092.17,794.2 1092.17,810.42 1234.48,952.73 1388.95,952.73 J1.23
PC13: J1.19 U3.26 | length 817.7
  Top Layer 1 w5: J1.19 1223.89,987.67 1223.89,956.28 1082.17,814.56 1082.17,798.34 1081.87,798.04 1081.87,539.41 1187.46,433.83 1210.58,433.83 1298.6,433.83 1307.09,442.31 U3.26
PC15: J1.21 U3.27 | length 1029.7
  Top Layer 1 w5: U3.27 1322.83,441.21 1305.46,423.83 1206.43,423.83 1183.31,423.83 1071.87,535.27 1071.87,802.18 1072.17,802.48 1072.17,815.22 1071.87,815.52 1071.87,818.4 1181.92,928.46 1181.92,1010.18 1204.58,1032.83 1290,1032.83 J1.21
SW: C31.2 R12.2 Switch.3 Switch.4 U4.6 | length 373.5
  Top Layer 1 w5: U4.6 2245.78,613.47 2350.16,613.47 R12.2 C31.2 2353.65,694.28 Switch.3 Switch.4
U1_RX: R18.2 U3.34 U7.1 | length 1023.3
  Top Layer 1 w5: U7.1@832.47,730.9 U7.1@836.86,726.51 ; U7.1 832.47,742.25 849.94,759.71 875.82,759.71 v1(877.42,758.11) 876.7,757.39 876.7,727.56 R18.2 ; v1(940.62,760.31) 941.4,760.31 1001.87,699.83 1001.87,506.27 1154.32,353.83 1374.38,353.83 1433.07,412.52 U3.34
  Bottom Layer w5: v1(877.42,758.11) 878.52,759.21 939.52,759.21 v1(940.62,760.31)
U1_TX: U3.35 U7.4 | length 1110.7
  Top Layer 1 w5: U7.4 755.7,758.21 785.85,788.36 860.4,788.36 876.68,788.36 887.44,788.36 921.57,754.22 921.57,743.47 921.57,570.33 1148.07,343.83 1378.52,343.83 1448.82,414.13 U3.35
USBD_N: U3.38 USB1.A7 USB1.B7 | length 553
  Top Layer 1 w6: v1@1411.47,288.96 1412.99,287.43 1412.99,255.67 USB1.B7 ; USB1.A7@1453.43,254.6 1453.72,254.89 1453.72,284.81 v1(1453.55,284.98)
  Top Layer 1 w7: v1@1411.47,288.96 1411.47,338.48 1487.06,414.08 1579.9,414.08 1590.4,424.58 1590.4,494 1563.84,520.56 1508.98,520.56 1508.11,519.69 U3.38 ; USB1.B7 USB1.B7@1416.92,256.55
  Bottom Layer w6: v1@1411.47,288.96 1415.44,284.98 v1(1453.55,284.98)
  other v1: 1411.47,284.98
USBD_P: U3.39 USB1.A6 USB1.B6 | length 577.8
  Top Layer 1 w7: USB1.A6 1431.79,256.55 1431.79,275.96 1431.36,276.4 1431.36,301.68 ; USB1.B6 1473.57,288.12 1460.01,301.68 1431.36,301.68 ; U3.39 1508.11,535.43 1508.98,534.56 1569.64,534.56 1604.4,499.8 1604.4,418.78 1585.7,400.08 1492.86,400.08 1431.36,338.57 1431.36,301.68
VANA: C20.1 C21.1 R17.1 U3.15 U3.16 | length 180.7
  Top Layer 1 w5: C21.1 1164.51,654.67 1200.04,654.67 C20.1 ; R17.1 1200.75,688.3 1200.75,654.86 C20.1 ; U3.16 1235.23,629.92 1220.02,645.13 ; U3.15 1259.3,645.13 1220.02,645.13 ; C20.1 1202.38,654.42 1211.67,645.13 1220.02,645.13
VDD_3V3: BOOT.3 BOOT.4 C2.1 C3.1 C7.1 C12.1 C13.1 C14.1 C17.1 C18.1 C28.1 C36.1 D3.1 D8.1 J1.1 J1.17 L1.2 R4.1 R12.1 R16.2 R17.2 R18.1 R25.2 U3.4 U3.11 U3.23 U3.40 U4.1 U5.5 U6.3 U6.7 U6.8 | length 6747.1
  Top Layer 1 w8: R18.1 876.13,688.68 895.87,688.68 v1(896.03,688.52) ; C14.1 1204.82,519.62 1259.78,519.62 U3.23 ; v1(1243.13,864.22) 1266.04,841.31 C18.1 1267.39,841.67 1301.66,841.67 C17.1 1302.12,842.02 1307.09,837.06 U3.11 ; U3.4 1417.32,737.3 1423.08,743.06 1423.08,788.76 1451.93,817.61 v1(1452.05,817.61) ; U3.40 1570.7,551.18 1616.9,504.98 1616.9,492.61 C13.1@1638.75,470.77 ; C3.1@1783.49,619.22 v1(1807.11,642.84) ; v1(1955.35,512.23) R4.1 1955.44,486.88 1990.88,486.88 C2.1 ; U4.1 2245.21,535.31 2265.03,535.31 2269.76,530.58 C28.1 2296.76,531.06 2296.76,564.92 v1(2296.29,565.39)
  Top Layer 1 w10: BOOT.3@95.47,662.05 104.25,670.83 v1(131.64,670.83) ; BOOT.4 95.47,647.64 104.25,638.86 104.94,638.86 185.65,558.15 D8.1 ; J1.1 281.03,1041.81 281.03,1113.99 314.69,1147.66 1032.41,1147.66 1077.97,1102.1 1077.97,1044.86 J1.17 1056.8,920.57 v1(1056.8,808.85) ; v1(380.86,619.35) 382.42,619.35 384.49,617.28 C36.1 460.97,617.28 U5.5 ; v1(1127.24,675.53) 1128.8,675.53 1139.19,685.93 1160.37,685.93 R17.2 ; v1(1132.09,759.74) 1132.46,759.36 1162.78,759.36 R16.2 ; v1(1176.15,516.44) 1176.82,515.77 1199.63,515.77 C14.1 ; C13.1 1638.75,470.77 1658.54,490.56 1667.85,490.56 1668.2,490.21 1733.84,490.21 1750.56,506.93 1750.56,613.36 1756.42,619.22 C3.1 v1(1781.92,686.33) ; v1(1663.71,714.17) 1691.55,686.33 v1(1781.92,686.33) ; U6.7 1823.51,790.42 1823.51,728.93 C7.1 1823.04,727.45 v1(1781.92,686.33) ; U6.3 1934.57,810.23 1960.55,810.23 1983.71,787.07 1983.71,685.72 v1(1983.26,685.27) ; R25.2 2361.16,309.09 2387.85,335.79 D3.1 2412.83,371.11 2423.16,381.44 2423.16,548.32 v1(2390.6,580.88) 2391.12,581.4 2391.12,609.46 R12.1
  Top Layer 1 w20: L1.2 1781.13,565.49 1781.13,618.44 C3.1
  Bottom Layer w8: v1(896.03,688.52) 999.55,688.52 1056.8,745.77 ; v1(1807.11,642.84) 1903.37,642.84 1955.35,590.87 v1(1955.35,512.23)
  Bottom Layer w10: v1(131.64,670.83) 330.3,670.83 v1(368.15,708.68) ; J1.1 368.15,954.69 v1(368.15,708.68) ; v1(380.86,619.35) 380.86,695.96 v1(368.15,708.68) ; J1.17 1129.53,939.73 1205.04,864.22 v1(1243.13,864.22) 1405.44,864.22 v1(1452.05,817.61) 1555.49,714.17 v1(1663.71,714.17) ; v1(1132.09,759.74) 1082.97,808.85 v1(1056.8,808.85) 1056.8,745.77 1127.03,675.53 v1(1127.24,675.53) 1102.17,650.45 1102.17,590.42 v1(1176.15,516.44) ; v1(1781.92,686.33) 2175.35,686.33 v1(2296.29,565.39) 2312.93,582.04 2385.37,582.04 2385.43,581.98 2389.5,581.98 v1(2390.6,580.88)
VDD_5V: C4.1 C29.1 D1.K D2.K J1.2 J1.4 U1.1 U1.4 U5.3 | length 2222.3
  Top Layer 1 w10: v1(479.45,800.25) 479.32,800.12 479.32,783.07 C29.1 479.7,782.41 479.7,762.31 485.62,756.39 485.62,734.29 U5.3 ; U1.4 1834.68,448.65 v1(1858.91,448.65) ; v1(1909.29,515.25) v1(1909.29,515.25) 1909.33,550.38 U1.1@1909.29,550.43
  Top Layer 1 w20: v1(1615.45,377.21) 1641.31,403.06 D2.K D1.K@1748.52,403.06 ; D1.K@1748.6,402.66 D1.K 1834.46,402.66 1834.57,402.78 U1.4
  Bottom Layer w10: v1(1858.91,448.65) 1908.19,497.94 1908.19,514.15 v1(1909.29,515.25)
  Bottom Layer w20: J1.2 J1.4 479.45,1043.38 v1(479.45,800.25) 480.43,799.28 541.62,799.28 963.7,377.21 v1(1615.45,377.21)
VDD_12V: C5.1 D6.A J2.5 U7.7 | length 454.3
  Top Layer 1 w10: U7.7 806.88,591.39 813.44,584.83 813.44,568.68 C5.1 814.21,567.91 814.21,449.93 D6.A 814.45,421.15 842.35,393.26 886.71,393.26 966.38,313.59 J2.5
VDD_SOC: C10.2 C11.1 C15.1 C16.1 U3.10 U3.37 U3.43 | length 1202
  Top Layer 1 w8: U3.10 1322.83,798.15 1337.16,812.48 C16.1 1337.88,840.43 1372.49,840.43 1395.84,840.43 v1(1396.56,839.71) ; U3.37 1531.1,503.94 1540.12,494.92 C11.1 v1(1564.68,494.92) ; U3.43 1582.21,598.43 1614.28,630.49 1625.06,630.49 1638.76,644.18 C10.2 1641.48,647.64 1641.48,665.94 v1(1642.96,667.42)
  Bottom Layer w8: v1(1396.56,839.71) 1541.39,694.88 1615.5,694.88 1641.13,669.25 v1@1642.28,669.25 ; v1(1564.68,494.92) 1724.28,494.92 1747.19,517.84 1747.19,637.46 1717.23,667.42 v1(1642.96,667.42)
VUSB1: D2.A USB1.A4 USB1.A9 USB1.B4 USB1.B9 | length 427.7
  Top Layer 1 w20: USB1.A4 1350.47,255.06 v1(1350.47,283.64) ; USB1.B4 1538.85,254.47 v1(1538.85,291.04) 1541.43,293.62 1673.76,293.62 1683.2,303.06 D2.A
  Bottom Layer w20: v1(1350.47,283.64) 1350.47,291.23 1367.09,307.85 1522.04,307.85 v1(1538.85,291.04)
VUSB2: D1.A USB2.A4 USB2.A9 USB2.B4 USB2.B9 | length 452.8
  Top Layer 1 w20: D1.A 1890.25,302.66 1900.96,291.95 1903.51,291.95 v1(1904.42,291.04) 1904.42,254.48 USB2.A4 ; USB2.A9 2093.1,254.19 v1(2093.1,291.04)
  Bottom Layer w20: v1(1904.42,291.04) 1938.03,324.65 2059.49,324.65 v1(2093.1,291.04)
pads on no net: U4.2 U4.3 U4.7 U4.8 U4.9 U4.14 U4.15 U4.16 U4.17 U4.18 U4.25 U4.26 U4.27 U4.28 U4.31 U7.8 USB1.A8 USB1.B8 USB2.A8 USB2.B8

## Polygon pours and split planes (outlines as drawn)
GND on Bottom Layer "GND_L02_P001" (solid, pour order 1): 118.11,0.02 1268.06,0.02 1268.06,224.58 1620.03,224.58 1620.03,0.02 1822.59,0.02 1822.59,224.58 2174.55,224.58 2174.55,0.46 2175.05,-0.04 2440.91,-0.04 ccw(c2440.96,118.11) 2559.11,118.06 2559.06,118.12 2559.06,1063.02 2559.05,1063.55 ccw(c2440.94,1062.99) 2441.4,1181.1 2440.91,1181.12 118.11,1181.12 118.11,1181.09 ccw(c118.11,1062.99) 0.01,1062.99 0.01,118.12 ccw(c118.11,118.12)
GND on Top Layer 1 "GND_L01_P000" (solid, pour order 0): 118.11,0.02 1268.06,0.02 1268.06,224.58 1620.03,224.58 1620.03,0.02 1822.59,0.02 1822.59,224.58 2174.55,224.58 2174.55,0.46 2175.05,-0.04 2440.91,-0.04 ccw(c2440.96,118.11) 2559.11,118.06 2559.06,118.12 2559.06,1063.02 2559.05,1063.55 ccw(c2440.94,1062.99) 2441.4,1181.1 2440.91,1181.12 118.11,1181.12 118.11,1181.09 ccw(c118.11,1062.99) 0.01,1062.99 0.01,118.12 ccw(c118.11,118.12)

## Keep-outs
Keep-Out Layer:
  lines w5: 118.11,1181.09 ccw(c118.11,1062.99) 0.01,1062.99 0.01,118.12 ccw(c118.11,118.12) 118.11,0.02 1268.06,0.02 1268.06,224.58 1620.03,224.58 1620.03,0.02 1822.59,0.02 1822.59,224.58 2174.55,224.58 2174.55,0.46 2175.05,-0.04 2440.91,-0.04 ccw(c2440.96,118.11) 2559.11,118.06 2559.06,118.12 2559.06,1063.02 2559.05,1063.55 ccw(c2440.94,1062.99) 2441.4,1181.1 2440.91,1181.12 118.11,1181.12 ; 118.11,1181.09 118.11,1181.12
  lines w10: 2440.91,-0.04 ccw(c2440.96,118.11) 2559.11,118.06 ; 2440.91,0.02 118.11,0.02 cw(c118.11,118.12) 0.01,118.12 0.01,1063.02 cw(c118.11,1062.99) 118.11,1181.09 2440.91,1181.12 ; 2441.4,1181.1 cw(c2440.94,1062.99) 2559.05,1063.55 ; 2559.06,118.12 2559.06,1063.02

## Silkscreen, mask and mechanical layers (free items; w line width, h text height)
Top Overlay:
  rectangle: 625.38,63.51 822.23,260.36
  text "HPM5151-EVK-Lite" at 441.16,839.7 h75
  text "BOOT" at 20.09,816.83 h50 r270
  text "RST" at 20.09,472.56 h50 r270
  text "G" at 707.91,374.02 h50
  text "12V" at 986.34,374.07 h50
  text "L" at 414.01,373.44 h50
  text "H" at 557.65,373.35 h50
  text "LIN" at 839.53,373.63 h50
Bottom Overlay:
  text "+5V" at 312.17,837.79 h50 r270
  text "+5V" at 412.32,837.79 h50 r270
  text "PB01" at 612.61,834.93 h50 r270
  text "PY01" at 1611.92,834.75 h50 r270
  text "PA13" at 2012.52,832.94 h50 r270
  text "PA01" at 2212.35,833.01 h50 r270
  text "PA12" at 1811.64,832.7 h50 r270
  text "PA10" at 1312.4,831.18 h50 r270
  text "GND" at 512.46,828.94 h50 r270
  text "GND" at 912.55,828.94 h50 r270
  text "GND" at 1212.26,828.94 h50 r270
  text "GND" at 1712.07,828.94 h50 r270
  text "GND" at 1912.37,828.94 h50 r270
  text "PB00" at 712.72,828.44 h50 r270
  text "PC02" at 812.4,828.26 h50 r270
  text "PA03" at 1012.7,828.27 h50 r270
  text "PA09" at 1112.52,827.32 h50 r270
  text "PC07" at 1412.09,827.11 h50 r270
  text "PC06" at 1512.24,827.5 h50 r270
  text "PA00" at 2112.67,826.52 h50 r270
  text "3V3" at 312.14,681.21 h50 r270
  text "3V3" at 1111.97,681.21 h50 r270
  text "PA11" at 1712.03,676.59 h50 r270
  text "PC13" at 1212.2,672.09 h50 r270
  text "PC15" at 1312.39,671.17 h50 r270
  text "PC10" at 1412.58,670.33 h50 r270
  text "PB03" at 412.38,669.11 h50 r270
  text "PB02" at 512.15,668.86 h50 r270
  text "GND" at 711.54,667.86 h50 r270
  text "GND" at 1512.77,667.86 h50 r270
  text "GND" at 2212.12,667.86 h50 r270
  text "PA02" at 1012.1,666.95 h50 r270
  text "PY00" at 1613.49,667.18 h50 r270
  text "PC08" at 612.87,666.73 h50 r270
  text "PC05" at 811.72,666.51 h50 r270
  text "PA06" at 1912.53,666.18 h50 r270
  text "PA05" at 2012.25,666.28 h50 r270
  text "PC00" at 911.91,665.66 h50 r270
  text "PA07" at 1812.8,665.79 h50 r270
  text "PA04" at 2112.39,665.56 h50 r270
Mechanical 1:
  lines w5: 1268.06,-0.04 1268.06,0.02 ; 2174.55,0.46 2174.55,224.58 ; 2174.55,184.39 2174.55,224.58 ; 2175.05,-0.04 2440.91,-0.04 ccw(c2440.96,118.11) 2559.11,118.06 2559.06,118.12 2559.06,1063.02 2559.05,1063.55 ccw(c2440.94,1062.99) 2441.4,1181.1 2440.91,1181.12 118.11,1181.12 ; 118.11,1181.09 ccw(c118.11,1062.99) 0.01,1062.99 0.01,118.12 ccw(c118.11,118.12) 118.11,0.02 1268.06,0.02 ; 118.11,1181.09 118.11,1181.12 ; 1268.06,0.02 1268.06,224.58 1620.03,224.58 1620.03,0.02 1822.59,0.02 ; 1822.59,0.02 1822.59,224.58 ; 1822.59,0.02 1822.59,224.58 ; 1822.59,224.58 2174.55,224.58 ; 1822.59,224.58 2174.55,224.58